# Altium PCB ESP32-C3FH4.PcbDoc (part 1 of 2)
Units mil, origin at the board's own origin, x right, y up, seen from the top; angles counter-clockwise.
Board outline 1414.34 x 2244.79 mil, 4 copper layers (Top Layer, GND, POWER, Bottom Layer), stack 30.634 mil thick; 67 components, 59 nets, 293 pads, 163 vias.
Unrouted connection lines stored in the file: 2.
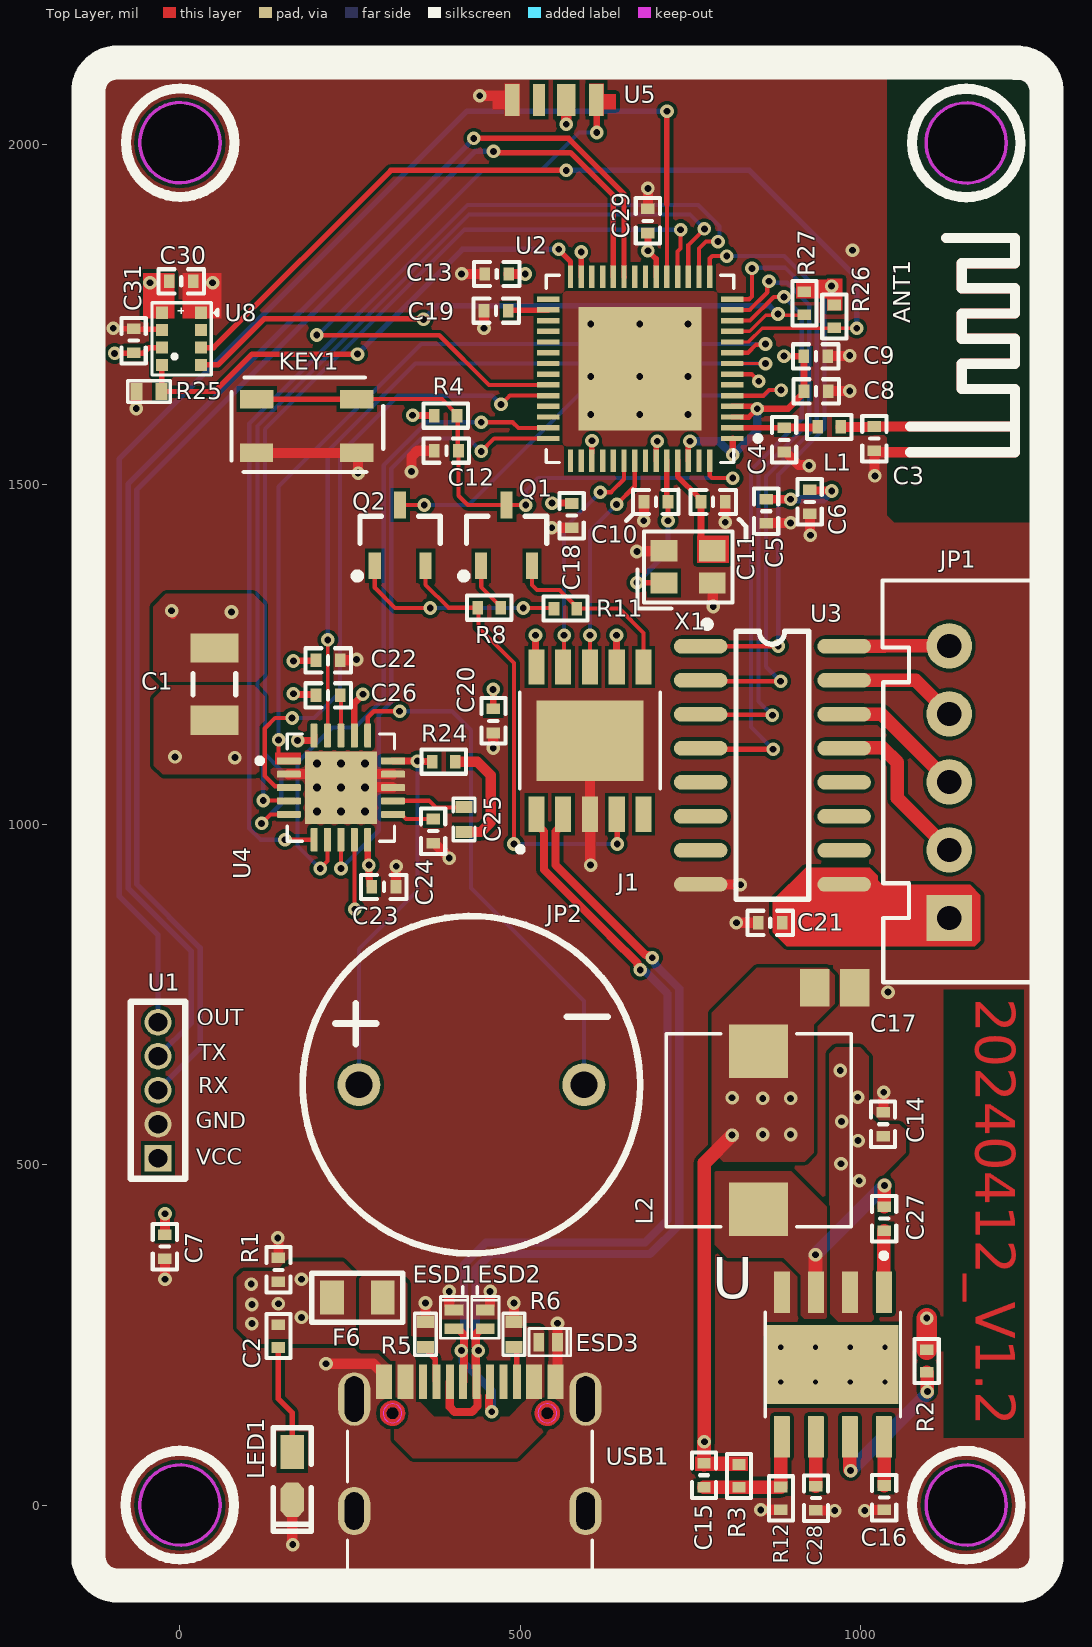
[diagram p0: Top Layer view]
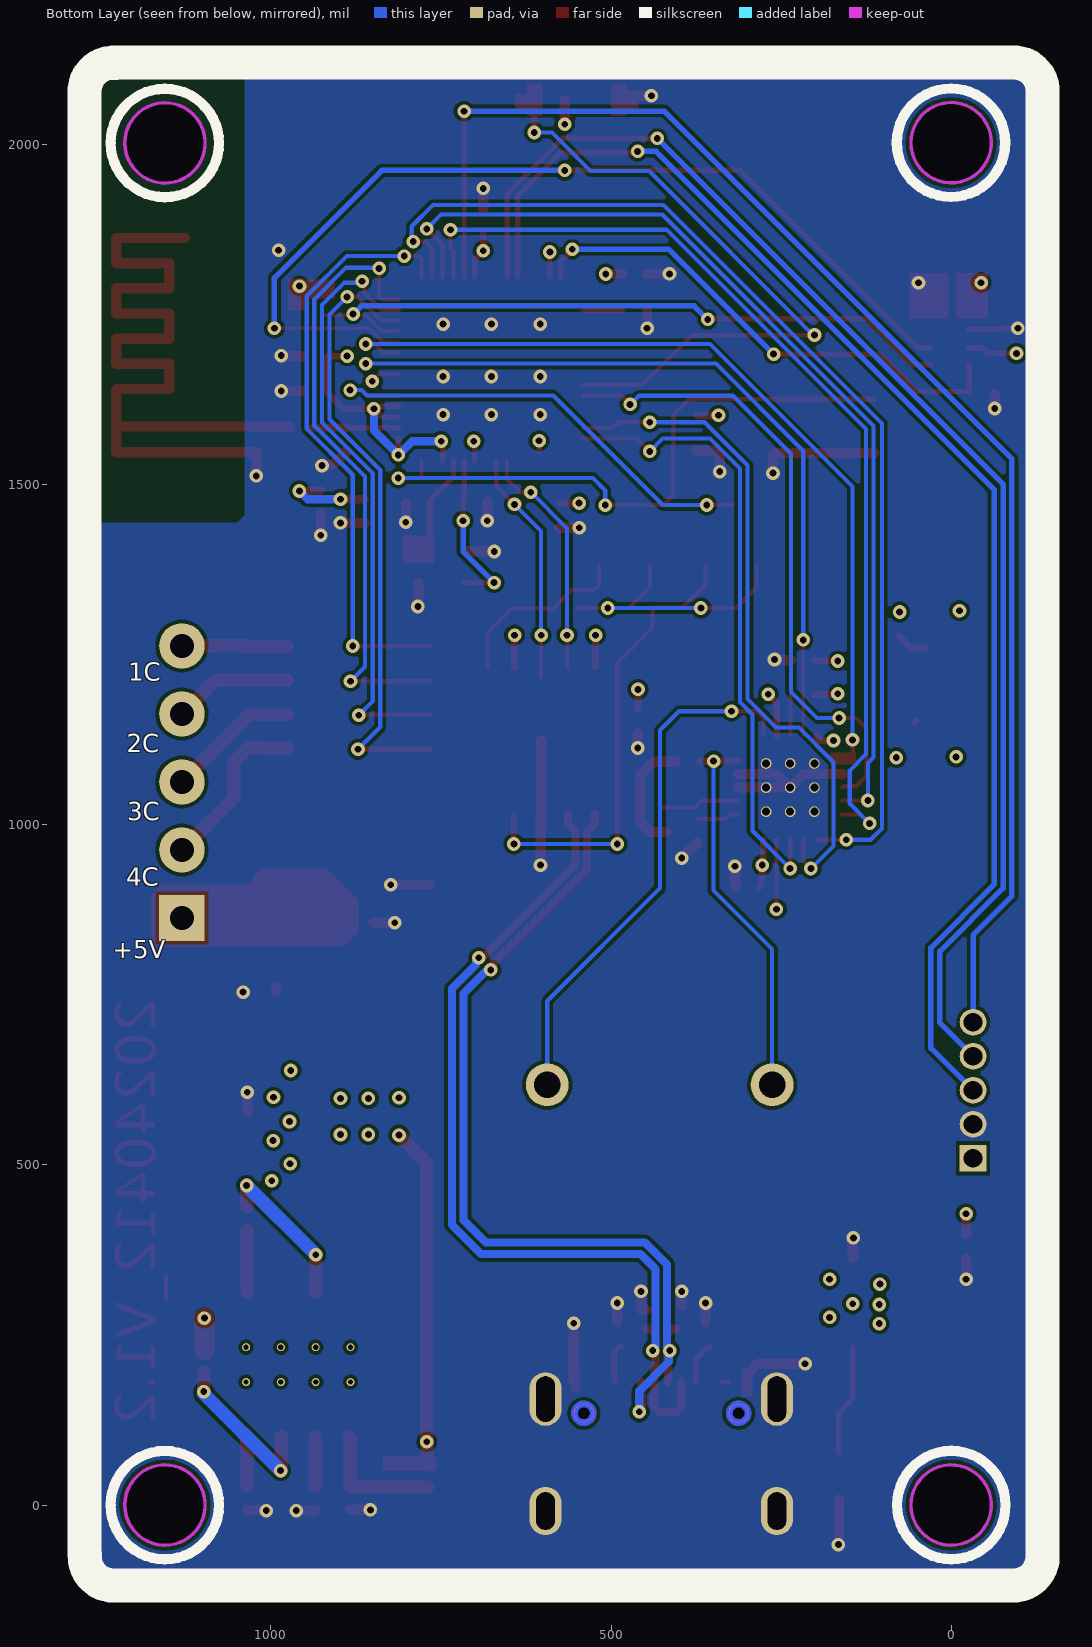
[diagram p1: Bottom Layer view, seen from below]
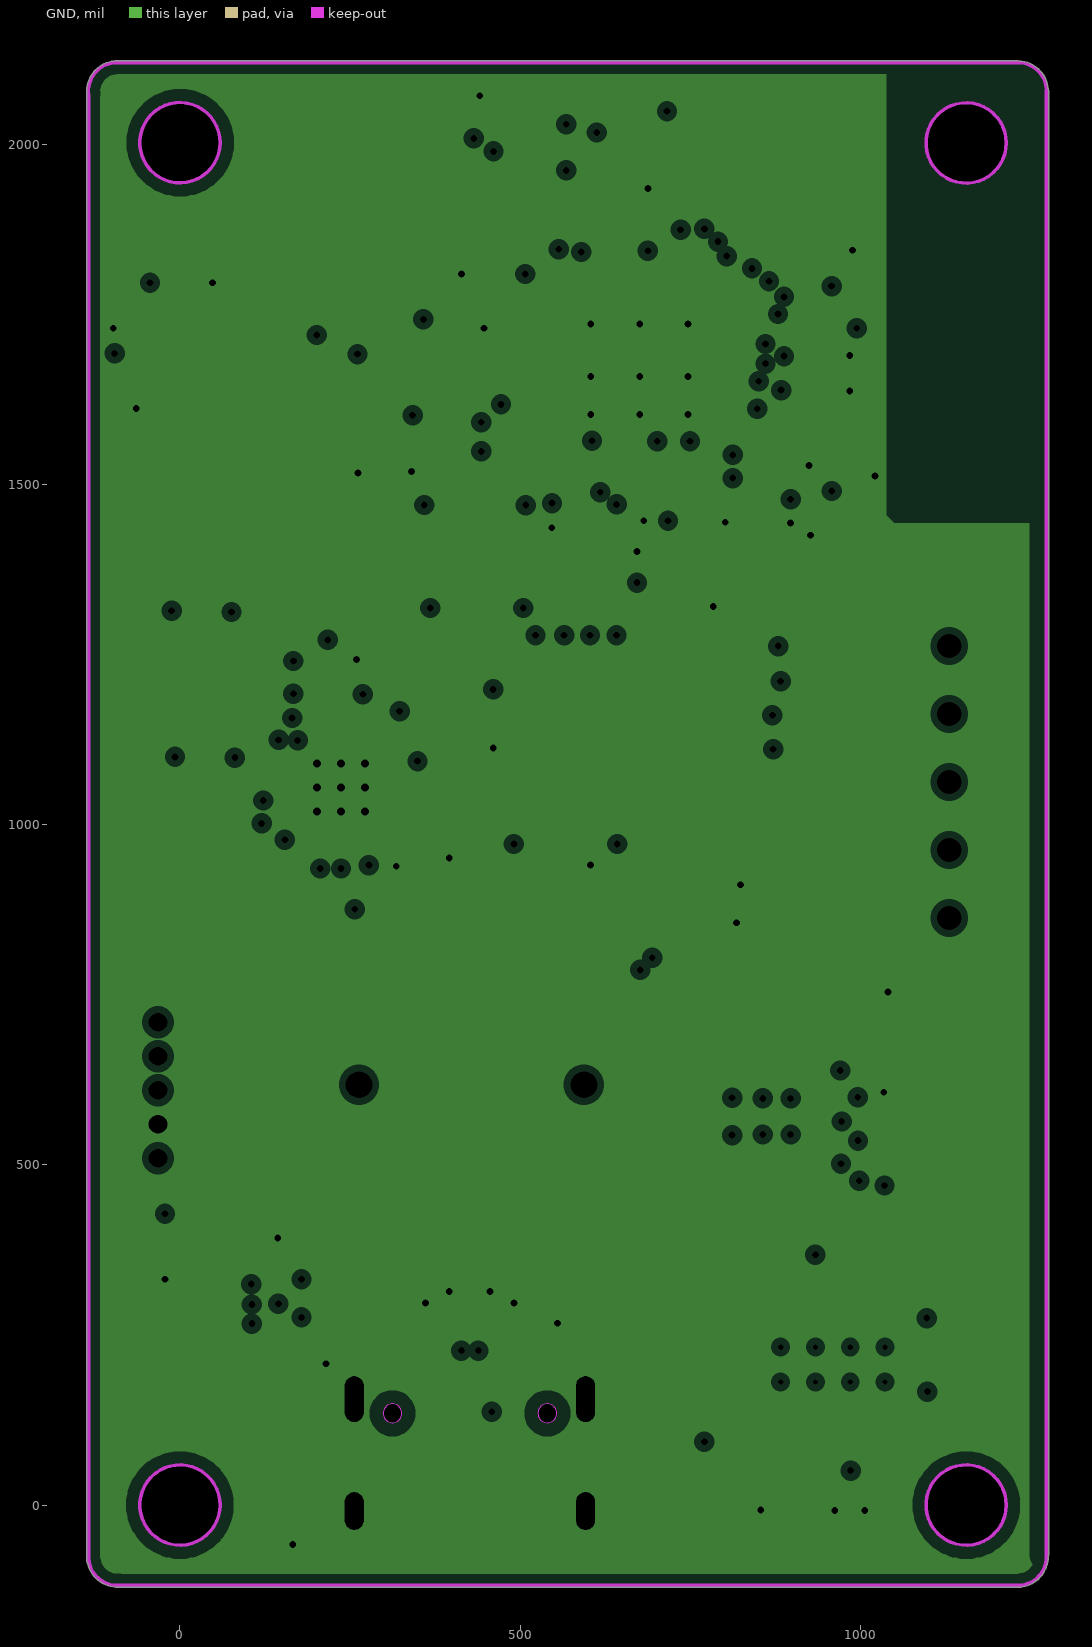
[diagram p2: GND, clearances drawn from the general rule]
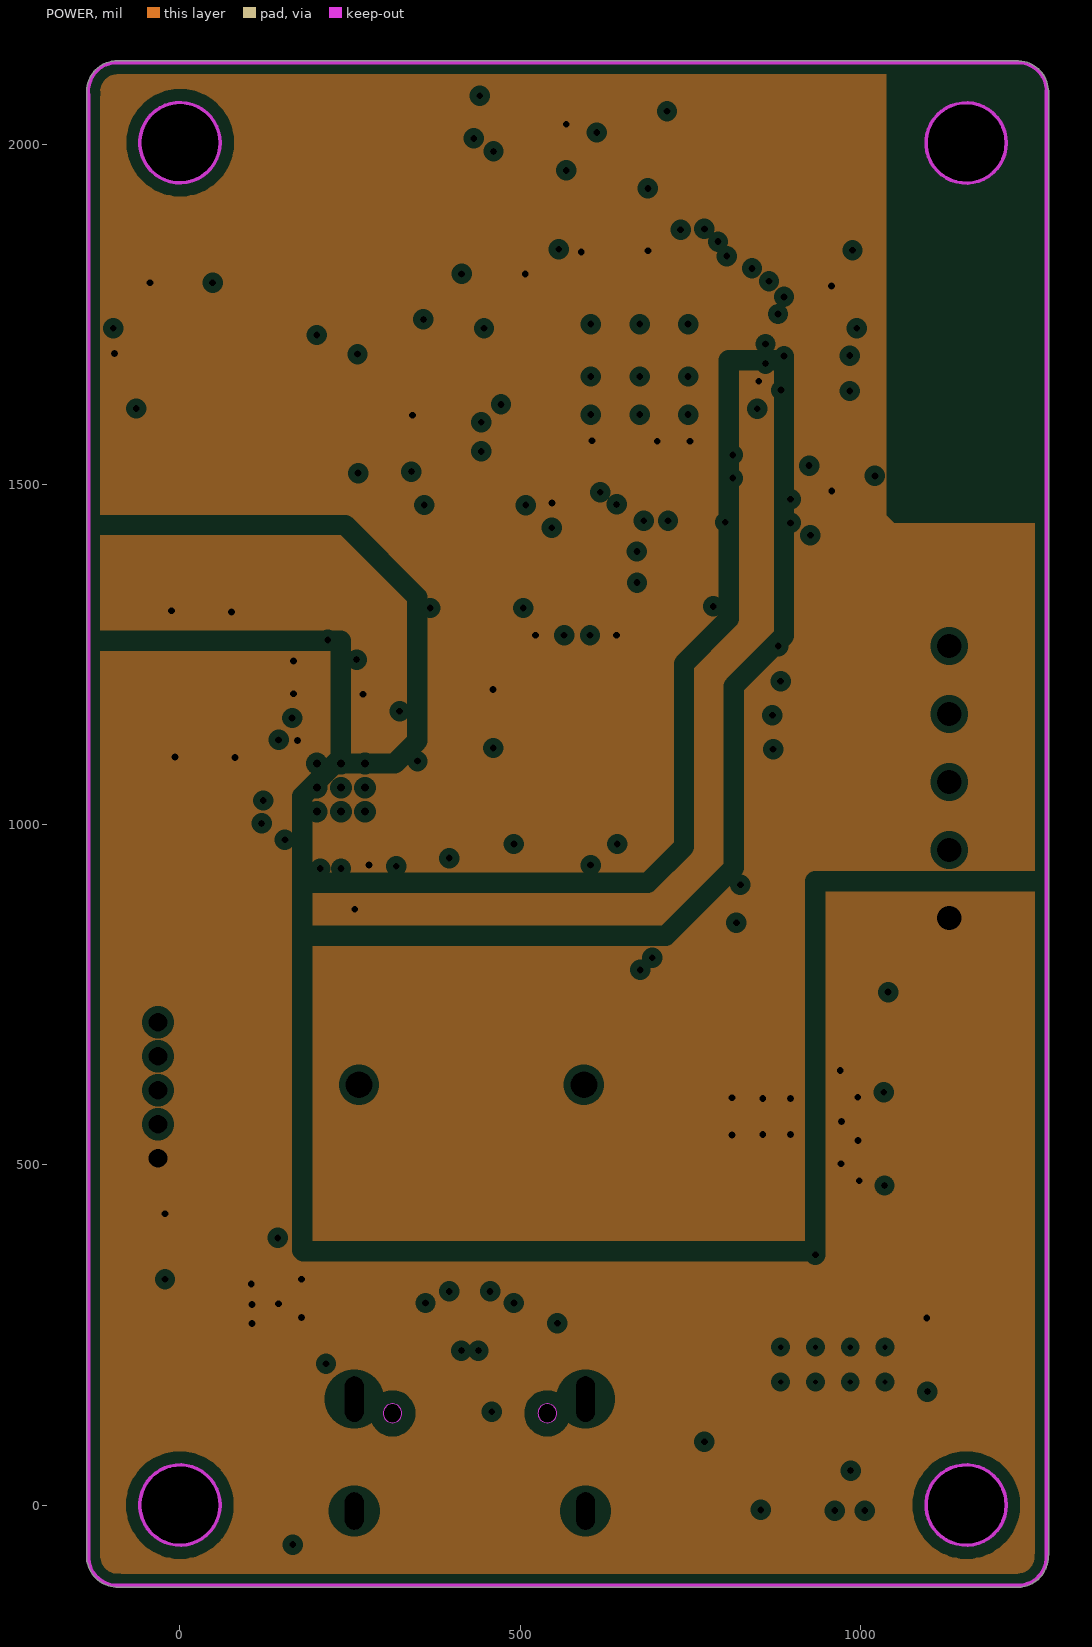
[diagram p3: POWER, clearances drawn from the general rule]
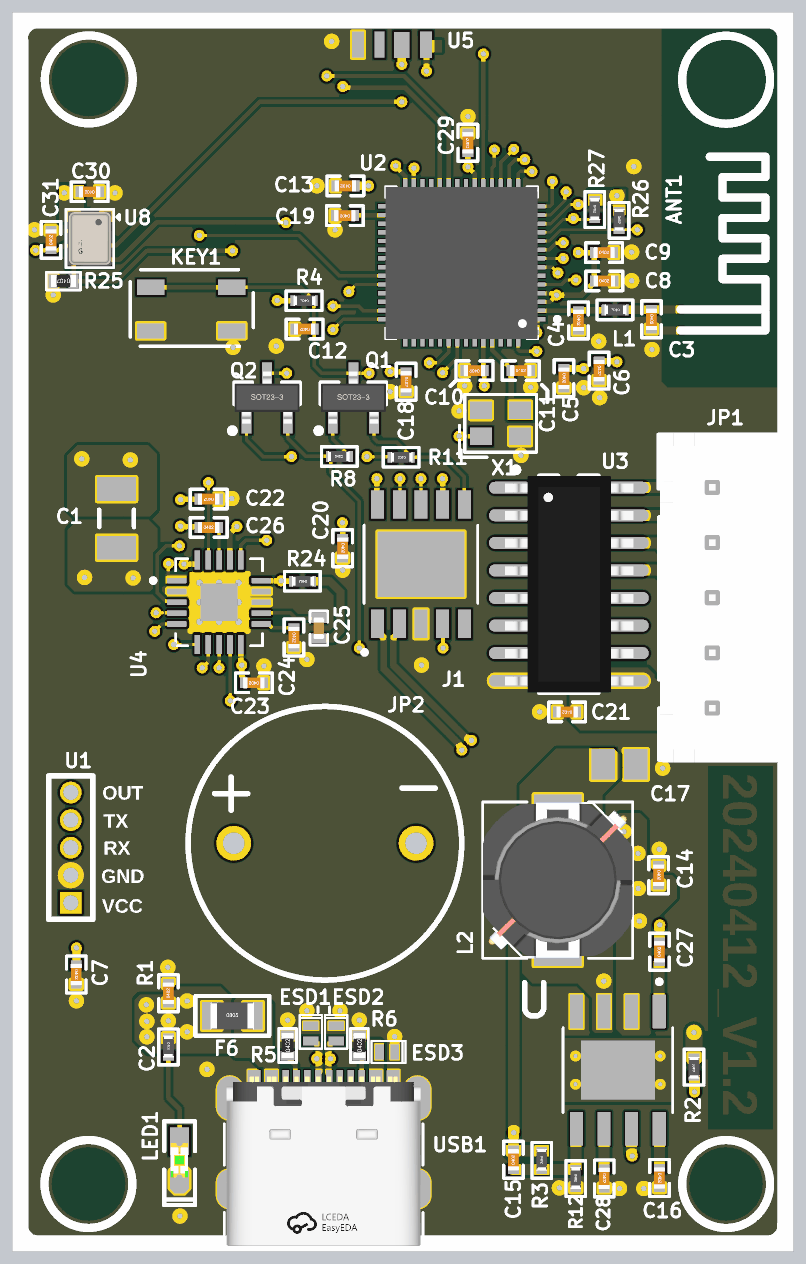
[diagram p4: 3D render of the assembled board from above, using the file's embedded part models]

## Layer stack, top to bottom
Top Solder: solder mask 0.4, Solder Resist, Dk 3.5
Top Layer: signal copper 1.4
Dielectric 1: core 10, FR-4, Dk 4.2
GND: plane copper 1.417, net GND
Dielectric 3: prepreg 5, Dk 4.2
POWER: plane copper 1.417, net (Multiple Nets)
Dielectric 2: core 10, Dk 4.2
Bottom Layer: signal copper 1.4
Bottom Solder: solder mask 0.4, Solder Resist, Dk 3.5

## Board outline
-137.31,-82.02 -137.31,2073.88 -137.03,2075.16 cw(c-92.21,2078.18) -97.24,2122.82 -95.21,2123.58 1231.89,2123.58 1233.89,2122.85 cw(c1231.64,2077.98) 1276.45,2081.16 1277.04,2079.28 1277.04,-72.82 1276.36,-75.82 cw(c1231.44,-75.82) 1238.5,-120.18 1236.19,-121.22 -88.91,-121.22 -90.59,-120.72 cw(c-91.91,-75.82)
cut-out: 1156.2,-59.09 cw(c1156.2,-0.03) 1097.14,-0.03 cw(c1156.2,-0.03) 1156.2,59.02 cw(c1156.2,-0.03) 1215.26,-0.03 cw(c1156.2,-0.03)
cut-out: 1156.2,1943.31 cw(c1156.2,2002.37) 1097.14,2002.37 cw(c1156.2,2002.37) 1156.2,2061.42 cw(c1156.2,2002.37) 1215.26,2002.37 cw(c1156.2,2002.37)
cut-out: 0.5,1943.82 cw(c0.5,2002.88) -58.56,2002.88 cw(c0.5,2002.88) 0.5,2061.93 cw(c0.5,2002.88) 59.56,2002.88 cw(c0.5,2002.88)
cut-out: -59.06,0 ccw(c0,0) 0,-59.06 ccw(c0,0) 59.06,0 ccw(c0,0) 0,59.06 ccw(c0,0)

## Design rules (kind name [scope] priority, off if disabled: settings)
Clearance [All] p1: gap=5 ignorepadtopadclearanceinfootprint=FALSE except(2: Arc-SMDPad Track-SMDPad SMDPad-SMDPad; 3: Arc-THPad Track-THPad SMDPad-THPad THPad-THPad)
ComponentClearance [All] p1: gap=10 collisioncheckmode=3 verticalgap=10 showdistances=TRUE
DiffPairsRouting DiffPairsRouting_2 [All] p1: maxlimit=5 minlimit=5 mostfreqgap=5 toplayer_minwidth=12 toplayer_maxwidth=12 toplayer_prefwidth=12 bottomlayer_minwidth=12 bottomlayer_maxwidth=12 bottomlayer_prefwidth=12 impedanceprofiledriven=TRUE impedanceprofileid={24D7325C-6BC3-4DBD-915D-B261285324E1} impedanceprofilevalue=90.000000 maxuncoupledlength=500
HoleToHoleClearance [All] p1: gap=0 allowstackedmicrovias=TRUE
MatchedLengths USB [InNetClass('USB')] p1: tolerance=20 checknetsindiffpair=TRUE checkdiffpairvsdiffpair=FALSE checkxsignals=FALSE checkothers=FALSE
MinimumSolderMaskSliver [All] p1: minsoldermaskwidth=0
PlaneClearance [All] p1: clearance=10
PlaneConnect [All] p1: planeconnectstyle=Direct reliefexpansion=20 reliefentries=4 reliefconductorwidth=10 reliefairgap=10
PolygonConnect [All] p1: connectstyle=Direct reliefconductorwidth=10 reliefentries=4 polygonreliefangle="90 Angle" airgapwidth=10
RoutingVias [All] p1: holewidth=10 width=20 viastyle="Through Hole" minholewidth=10 minwidth=20 maxholewidth=10 maxwidth=20
SilkToSilkClearance [All] p1: silktosilkclearance=0
SilkToSolderMaskClearance [IsPad] p1: minsilkscreentomaskgap=0 clearancetoexposedcopper=TRUE
SolderMaskExpansion [All] p1: expansion=4 istentingtop=FALSE
ViasUnderSMD [All] p1: allowed=FALSE
Width power [InNetClass('power')] p1: maxlimit=100 minlimit=12 preferedwidth=12
Width [All] p2: maxlimit=100 minlimit=5 preferedwidth=8 minimp=50.000000 maximp=50.000000 favimp=50.000000
22 further rules are at their usual default settings.

## Classes and differential pairs
differential pair class USB_Lines: D
net class USB: D_N D_P
differential pair D: +D_P -D_N

## Components (designator, comment, footprint, x,y, rotation, side; value= is the part's Value field where it differs from the comment)
ANT1 "2.4G" 2.4GÌìÏß 1073.48,1550.68 r270 top locked
C1 "CA45A-A-25V-2.2UF-K" INDC3216 50.79,1206.78 r270 top locked value=2.2uF
C2 "0.1uF/25V" "C 0402_L" 144.79,345.78 r90 top locked
C3 "0.4pF/25V" "C 0402_L" 1020.79,1567.78 r270 top locked
C4 "0.4pF/25V" "C 0402_L" 888.38,1565.78 r270 top locked
C5 "0.1uF/25V" "C 0402_L" 861.91,1460.95 r270 top locked
C6 "10uF/10V" "C 0402_L" 925.79,1474.78 r270 top locked
C7 "0.1uF/25V" "C 0402_L" -22.21,379.78 r270 top locked
C8 "10uF/10V" "C 0402_L" 935.27,1637.34 r0 top locked
C9 "0.1uF/25V" "C 0402_L" 934.79,1688.78 r0 top locked
C10 "20pF/25V" "C 0402_L" 699.79,1474.78 r180 top locked
C11 "20pF/25V" "C 0402_L" 783.79,1474.78 r0 top
C12 "1uF/10V" "C 0402_L" 391.72,1550.01 r180 top locked
C13 "0.1uF/25V" "C 0402_L" 465.79,1809.78 r180 top locked
C14 "22uF/10V" "C 0402_L" 1033.79,559.78 r270 top locked value=15P
C15 "10pF/10V" "C 0402_L" 770.39,43.78 r90 top locked value=15P
C16 "8.2nF/25V" "C 0402_L" 1035.29,10.86 r270 top locked
C17 "22uF/25V" C0805 962.79,760.67 r0 top locked
C18 "0.1uF/25V" "C 0402_L" 575.94,1454.53 r270 top locked
C19 "0.1uF/25V" "C 0402_L" 464.79,1755.78 r180 top locked
C20 "0.1uF/25V" "C 0402_L" 460.79,1152.78 r270 top locked
C21 "0.1uF/25V" "C 0402_L" 867.79,855.93 r180 top locked
C22 "0.1uF/25V" "C 0402_L" 217.79,1241.78 r180 top locked
C23 "10nF/25V" "C 0402_L" 299.79,908.78 r180 top locked
C24 "0.1uF/25V" "C 0402_L" 372.35,990.78 r270 top locked
C25 "330pF" Cap-0402 417.79,1007.78 r270 top locked
C26 "15nF/25V" "C 0402_L" 217.79,1190.34 r0 top locked
C27 "0.1uF/10V" "C 0402_L" 1035.29,420.98 r90 top locked value=15P
C28 "1uF/25V" "C 0402_L" 934.98,10.06 r270 top locked
C29 "0.1uF/25V" "C 0402_L" 687.79,1887.78 r90 top locked
C30 "0.1uF/25V" "C 0402_L" 2,1799 r180 top
C31 "0.1uF/25V" "C 0402_L" -68,1711.71 r90 top
ESD1 "ESD5311N-2/TR" X1-DFN1006-2_L1.0-W0.6-RD 403,273 r270 top locked
ESD2 "ESD5311N-2/TR" X1-DFN1006-2_L1.0-W0.6-RD 449,273 r270 top locked
ESD3 "ESD5311N-2/TR" X1-DFN1006-2_L1.0-W0.6-RD 541.21,239.38 r180 top
F6 "6V1A" "R 0805_L" 260.79,304.78 r0 top locked
J1 "CH340K" *SOP100P600X160-11N 602.79,1123.78 r90 top locked
JP1 "HDR-1X5" XH2.54-LI-5P 1130.97,1063 r90 top locked
JP2 "超声波探头_C242180" SENSOR-TH_GU12XXC-40XX 428.55,617.78 r0 top locked
KEY1 "6*6*5" "TSW SMD-6*6*5" 285.79,1635.78 r180 top locked
L1 "0R1%" "R 0402_L"#1 955.56,1584.98 r180 top locked
L2 "CLF7045T-3R3N-D" IND_CLF7045T-3R3N-D 850.79,550.86 r270 top locked value=0R1%
LED1 "GREEN" "LED 0603B" 164.79,42.78 r270 top locked
Q1 "S8050" SOT23-3L 480.25,1425.78 r0 top locked
Q2 "S8050" SOT23-3L 323.79,1425.78 r0 top locked
R1 "1K" "R 0402_L"#1 144.8,249.36 r270 top locked
R2 "10K" "R 0402_L"#1 1097.85,210.78 r90 top locked
R3 "84.5K" "R 0402_L"#1 821.84,43.78 r270 top locked
R4 "10K" "R 0402_L"#1 391.72,1601.45 r180 top locked
R5 "5.1K" Res-0402 361,251 r90 top locked
R6 "5.1K" Res-0402 491,251 r90 top locked
R8 "10K" "R 0402_L"#1 453.78,1319.22 r0 top locked
R11 "10K" "R 0402_L"#1 567.78,1317.78 r180 top locked
R12 "25.5K" "R 0402_L"#1 883.54,10.86 r270 top locked
R24 "200R" "R 0402_L"#1 388.79,1092.78 r180 top locked
R25 "100K" Res-0402 -45.5,1637 r180 top
R26 "10K" "R 0402_L"#2 962,1747.27 r270 top
R27 "10K" "R 0402_L"#2 918,1766.73 r270 top
U "TPS54339DDA" VREG_LM5017MR/NOPB 959.84,206.4 r270 top locked
U1 "HLK-LD2410B" HDR-TH_5P-P1.27-V-M -32.21,609.78 r90 top locked
U2 "ESP32-S2FN4R2" QFN40P700X700X90-57N 676.54,1670.36 r180 top locked
U3 "ULN2003" SOP16 870.42,1087.45 r0 top locked
U4 "TUSS4470TRTJT" QFN50P400X400X80-21N 236.7,1054.69 r0 top locked
U5 "SK6812 SIDE-A" "SK6812 SIDE-A" 717.11,2099.35 r180 top locked
U8 "SPL06-001" SPL06-001 2.46,1714.39 r0 top
USB1 "KH-TYPE-C-16P" KH-TYPE-C-16P 426.29,86.28 r0 top locked
X1 "40MHz" "OSC 2016-4P" 759.79,1389.78 r0 top locked

## Footprints (in the part's own frame and the unit in brackets; to place one, negate y for a bottom-side part, rotate by r counter-clockwise, add the part's x,y. Pads: shape width x height; smd on the part's side, far side on the other; paste and mask are expansions set on the pad)
2.4GÌìÏß [mil]
  rect 10x10 smd: 1(-35,0) 2(3,1)
  Top Layer lines w15: 3,0 3,1 3,154 -35,154 ; -35,0 -35,154 ; -312,53 -312,154 -275,154 -275,76 -238,76 -238,154 -201,154 -201,76 -164,76 -164,154 -127,154 -127,76 -90,76 -90,154 -35,154
  silkscreen extent -312,0 3,154
*SOP100P600X160-11N [mm]
  rect 1.31x0.6 smd: 1(-2.75,2) 2(-2.75,1) 3(-2.75,0) 4(-2.75,-1) 5(-2.75,-2) 6(2.75,-2) 7(2.75,-1) 8(2.75,0) 9(2.75,1) 10(2.75,2)
  rect 3x4 smd: 11(0,0)
  silkscreen extent -4.16,-2.62 1.8,2.7
C0805 [mm] "Chip Capacitor, Body 2.0x1.3mm, IPC High Density"
  rect 1.1x1.4 smd: 1(-0.75,0) 2(0.75,0)
  body extent -1.1,-0.72 1.1,0.72, height 1.4
"C 0402_L" [mm] "ÎÞ¼«ÐÔÌùÆ¬µçÈÝ"
  rect 0.4x0.5 smd: 1(-0.45,0) 2(0.45,0)
  silkscreen extent -0.85,-0.45 0.85,0.45, body extent -0.5,-0.26 0.5,0.26, height 0.53
Cap-0402 [mil]
  rect 18x25 smd mask+2.36: 1(-18.5,0) 2(18.5,0)
  silkscreen extent -31,-16 31,16, body extent -20,-10 20,10, height 19
HDR-TH_5P-P1.27-V-M [mm]
  rect 1x1 hole 0.7: 1(-2.54,0)
  round 1 hole 0.7: 2(-1.27,0) 3(0,0) 4(1.27,0) 5(2.54,0)
  silkscreen extent -3.3,-1.02 3.3,1.02
IND_CLF7045T-3R3N-D [mm]
  rect 2x2.2 smd: 1(-2.95,0) 2(2.95,0)
  silkscreen extent -3.6,-3.45 3.6,3.45, body extent -3.6,-3.45 3.6,3.45, height 4.8
INDC3216 [mm] "Chip Inductor, Body 3.2x1.6mm, IPC High Density"
  rect 1.1x1.8 smd: 1(-1.35,0) 2(1.35,0)
  silkscreen extent -0.4,-0.8 0.4,0.8, body extent -1.7,-0.9 1.7,0.9, height 0.55
KH-TYPE-C-16P [mm]
  oval 1.2x2 hole 0.7 slot 1.7 at 90 deg paste+0 mask+0.051: 1(-4.32,1.765) 2(4.32,1.765)
  oval 1.2x1.8 hole 0.7 slot 1.4 at 90 deg paste+0 mask+0.051: 3(-4.32,-2.415) 4(4.32,-2.415)
  rect 0.3x1.3 smd paste-100 mask+0.05: A1(-3.35,2.415) A4(-2.55,2.415) A5(-1.25,2.415) A6(-0.25,2.415) A7(0.25,2.415) A8(1.25,2.415) A9(2.55,2.415) A12(3.35,2.415) B1(3.05,2.415) B4(2.25,2.415) B5(1.75,2.415) B6(0.75,2.415) B7(-0.75,2.415) B8(-1.75,2.415) B9(-2.25,2.415) B12(-3.05,2.415)
  Keep-Out Layer board cut-out: 3.24,1.235 3.205,1.387 3.108,1.509 2.968,1.576 2.812,1.576 2.672,1.509 2.574,1.387 2.54,1.235 2.54,1.235 2.575,1.083 2.672,0.961 2.812,0.894 2.968,0.894 3.108,0.961 3.205,1.083 3.24,1.235
  Keep-Out Layer board cut-out: -2.54,1.235 -2.575,1.387 -2.672,1.509 -2.812,1.576 -2.968,1.576 -3.108,1.509 -3.206,1.387 -3.24,1.235 -3.24,1.235 -3.205,1.083 -3.108,0.961 -2.968,0.894 -2.812,0.894 -2.672,0.961 -2.575,1.083 -2.54,1.235
  Multi-Layer circle w0.254: c-2.89,1.235 r0.35
  Multi-Layer circle w0.254: c2.89,1.235 r0.35
  silkscreen extent -4.57,-5.08 4.57,0.57, body extent -4.47,-5.05 4.47,2.76, height 3.25
"LED 0603B" [mil] "À¶É«0603LED"
  rect 50x35 smd: 1(-35,0.26)
  oct 50x35 smd: 2(35,0.26)
  silkscreen extent -71,-28 81,28, body extent -31,-16 32,16, height 24
"OSC 2016-4P" [mm]
  rect 1x0.8 smd: 1(-1.222,-0.872) 2(0.577,-0.871) 3(0.577,0.328) 4(-1.223,0.328)
  silkscreen extent -2.21,-1.83 1.33,1.06
QFN40P700X700X90-57N [mm]
  rect 0.84x0.2 smd mask+0.05: 1(-3.435,2.6) 2(-3.435,2.2) 3(-3.435,1.8) 4(-3.435,1.4) 5(-3.435,1) 6(-3.435,0.6) 7(-3.435,0.2) 8(-3.435,-0.2) 9(-3.435,-0.6) 10(-3.435,-1) 11(-3.435,-1.4) 12(-3.435,-1.8) 13(-3.435,-2.2) 14(-3.435,-2.6) 29(3.435,-2.6) 30(3.435,-2.2) 31(3.435,-1.8) 32(3.435,-1.4) 33(3.435,-1) 34(3.435,-0.6) 35(3.435,-0.2) 36(3.435,0.2) 37(3.435,0.6) 38(3.435,1) 39(3.435,1.4) 40(3.435,1.8) 41(3.435,2.2) 42(3.435,2.6)
  rect 0.2x0.84 smd mask+0.05: 15(-2.6,-3.435) 16(-2.2,-3.435) 17(-1.8,-3.435) 18(-1.4,-3.435) 19(-1,-3.435) 20(-0.6,-3.435) 21(-0.2,-3.435) 22(0.2,-3.435) 23(0.6,-3.435) 24(1,-3.435) 25(1.4,-3.435) 26(1.8,-3.435) 27(2.2,-3.435) 28(2.6,-3.435) 43(2.6,3.435) 44(2.2,3.435) 45(1.8,3.435) 46(1.4,3.435) 47(1,3.435) 48(0.6,3.435) 49(0.2,3.435) 50(-0.2,3.435) 51(-0.6,3.435) 52(-1,3.435) 53(-1.4,3.435) 54(-1.8,3.435) 55(-2.2,3.435) 56(-2.6,3.435)
  rect 4.6x4.6 smd paste-3: 57(0,0)
  silkscreen extent -4.5,-3.5 3.5,3.5, body extent -3.5,-3.5 3.5,3.5, height 0.9
QFN50P400X400X80-21N [mm]
  rrect25% 0.89x0.26 smd: 1(-1.945,1) 2(-1.945,0.5) 3(-1.945,0) 4(-1.945,-0.5) 5(-1.945,-1) 11(1.945,-1) 12(1.945,-0.5) 13(1.945,0) 14(1.945,0.5) 15(1.945,1)
  rrect25% 0.26x0.89 smd: 6(-1,-1.945) 7(-0.5,-1.945) 8(0,-1.945) 9(0.5,-1.945) 10(1,-1.945) 16(1,1.945) 17(0.5,1.945) 18(0,1.945) 19(-0.5,1.945) 20(-1,1.945)
  rect 2.7x2.7 smd paste-2: 21(0,0)
  round 0.4 hole 0.3 mask+0: 22(-0.9,0.9) 23(0,0.9) 24(0.9,0.9) 25(-0.9,0) 26(0,0) 27(0.9,0) 28(-0.9,-0.9) 29(0,-0.9) 30(0.9,-0.9)
  silkscreen extent -3.13,-2 2,2
"R 0402_L"#1 [mm] "1/16WÌùÆ¬µç×è"
  rect 0.4x0.5 smd: 1(-0.4,0) 2(0.45,0)
  silkscreen extent -0.8,-0.45 0.85,0.45, body extent -0.5,-0.25 0.5,0.25, height 0.3
"R 0402_L"#2 [mm]
  rect 0.4x0.5 smd: 1(-0.425,0) 2(0.425,0)
  silkscreen extent -0.82,-0.45 0.83,0.45, body extent -0.52,-0.25 0.48,0.25, height 0.3
"R 0805_L" [mil] "1/8WÌùÆ¬µç×è"
  rect 35x50 smd: 1(-37.4,0) 2(37.4,0)
  silkscreen extent -67,-36 67,36, body extent -39,-25 39,25, height 20
Res-0402 [mil]
  rect 18x25 smd mask+2.17: 1(-18.5,0) 2(18.5,0)
  silkscreen extent -32,-17 32,16, body extent -23,-11 23,11, height 16
SENSOR-TH_GU12XXC-40XX [mm]
  round 1.6 hole 1: 1(-4.2,0) 2(4.2,0)
  silkscreen extent -6.3,-6.3 6.3,6.3
"SK6812 SIDE-A" [mm]
  rect 0.55x1.2 smd: 1(2.667,0.855) 4(5.806,0.853)
  rect 0.7x1.2 smd: 2(3.789,0.858)
  rect 0.45x1.2 smd: 3(4.809,0.853)
  Top Layer region: 2.938,0.255 2.387,0.255 2.387,0.64 1.935,0.64 1.935,1.201 2.388,1.201 2.388,1.453 2.936,1.453
  Top Layer region: 5.53,1.452 6.081,1.452 6.081,1.204 6.533,1.204 6.533,0.647 6.08,0.647 6.08,0.254 5.532,0.254
SOP16 [mm] "£¨ËâÃ×¹¤·»£©"
  oval 2x0.55 smd: 1(-2.667,4.445) 2(-2.667,3.175) 3(-2.667,1.905) 4(-2.667,0.635) 5(-2.667,-0.635) 6(-2.667,-1.905) 7(-2.667,-3.175) 8(-2.667,-4.445) 9(2.692,-4.445) 10(2.692,-3.175) 11(2.692,-1.905) 12(2.692,-0.635) 13(2.692,0.635) 14(2.692,1.905) 15(2.692,3.175) 16(2.692,4.445)
  silkscreen extent -2.55,-5 1.37,5.39, body extent -2.92,-4.99 2.98,4.99, height 1.45
SOT23-3L [mm] "3x1.3x1mm(³¤¿í¸ß)"
  rect 0.45x1 smd: 1(-0.95,-1.143) 2(0.95,-1.143) 3(0,1.125)
  silkscreen extent -1.72,-1.65 1.5,0.7, body extent -1.5,-1.2 1.5,1.2, height 1.05
SPL06-001 [mm]
  rect 0.45x0.45 smd: 1(0.725,0.975) 2(0.725,0.325) 3(0.725,-0.325) 4(0.725,-0.975) 5(-0.725,-0.975) 6(-0.725,-0.325) 7(-0.725,0.325) 8(-0.725,0.975)
  silkscreen extent -1.1,-1.35 1.36,1.35, body extent -1,-1.25 1,1.25, height 0.96
"TSW SMD-6*6*5" [mm] "6*6*5mm"
  rect 1.25x0.7 smd: 1(0.66,2.261) 2(0.66,0.254) 3(4.394,0.254) 4(4.4,2.261)
  silkscreen extent -0.33,-0.56 5.33,2.97
VREG_LM5017MR/NOPB [mm]
  rrect5% 1.55x0.6 smd mask+0: 1(-2.7,1.905) 2(-2.7,0.635) 3(-2.7,-0.635) 4(-2.7,-1.905) 5(2.7,-1.905) 6(2.7,-0.635) 7(2.7,0.635) 8(2.7,1.905)
  rect 2.95x4.9 smd paste-3 mask+0: 9(0,0)
  round 0.3 hole 0.2: 10(-0.65,1.95) 11(0.65,1.95) 12(-0.65,0.65) 13(0.65,0.65) 14(-0.65,-0.65) 15(0.65,-0.65) 16(-0.65,-1.95) 17(0.65,-1.95)
  silkscreen extent -4.17,-2.52 1.95,2.52
X1-DFN1006-2_L1.0-W0.6-RD [mm]
  rect 0.4x0.7 smd paste+0 mask+0.051: 1(-0.35,0) 2(0.35,0)
  silkscreen extent -0.85,-0.51 0.71,0.51
XH2.54-LI-5P [mm] "½Ó²å¼þ£¬5P"
  rect 1.7x1.7 hole 0.9: 1(-5.08,0)
  round 1.7 hole 0.9: 2(-2.54,0) 3(0,0) 4(2.54,0) 5(5.08,0)
  silkscreen extent -7.48,-3.45 7.52,2.49, body extent -7.58,-3.3 7.58,2.4, height 7.03

## Part data
ANT1: library part ANT1, "PCB板载天线", BOM名称=PCB板载天线, 学习资源=www.ooocke.com, 版权归属=源创客
C1: library part "Cap Pol2", "Polarized Capacitor (Axial)", LatestRevisionDate=17-Jul-2002, LatestRevisionNote="Re-released for DXP Platform.", PackageDescription="Polarized Capacitor; 2 Leads", PackageReference=POLAR0.8, Published=8-Jun-2000, Publisher="Altium Limited"
C2 C3 C4 C5 C6 C7 C8 C9 C10 C11 C12 C13 C16 C17 C18 C19 C20 C21 C22 C23 C24 C26 C28 C29: library part C
C14 C15 C27: library part Cap, "Capacitor", Manufacturer="Generic Components", Class=Passive, Published=08/06/2000, Publisher="Altium Hobart Technology Centre", SubClass=Capacitor
C25: library part CC0402KRX7R9BB331, "50V 330pF X7R ±10% 0402 Multilayer Ceramic Capacitors MLCC - SMD/SMT ROHS", LCSC Part Number=C106206, Manufacturer=YAGEO, ComponentLink1Description=LCSC, ComponentLink1URL=https://www.lcsc.com/product-detail/Multilayer-Ceramic-Capacitors-MLCC-SMD-SMT_YAGEO-CC0402KRX7R9BB331_C106206.html, Item Type=Capacitor, Manufacturer Part Number=CC0402KRX7R9BB331
C30 C31: library part Capacitor
ESD1 ESD2 ESD3: library part tvs管
F6: library part JK-SMD0603-100L, JLCPCB Part Class="Extended Part", Manufacturer="Jinrui Electronic Materials Co.", Add into BOM=yes, Convert to PCB=yes, Device=JK-SMD0603-100L, Manufacturer Part=JK-SMD0603-100L, Name=6V1.5A, Origin Footprint=F0603, Supplier=LCSC, Supplier Part=C516069, Symbol=6V1A
J1: "USB to Serial Port Chip", Package=Package, Check_prices=https://www.snapeda.com/parts/CH340K/WCH/view-part/?ref=eda, MF=WCH, MP=CH340K, SnapEDA_Link=https://www.snapeda.com/parts/CH340K/WCH/view-part/?ref=snap
JP1: library part "Header 5", "5P接插件", BOM名称=5P接插件, 学习资源=www.ooocke.com, 版权归属=源创客
JP2: library part "Header 2", "2P接插件", BOM名称=2P接插件, 学习资源=www.ooocke.com, 版权归属=源创客
KEY1: library part "TSW DIP-6x6", "直插6x6轻触开关", BOM名称=直插6x6轻触开关, 学习资源=www.ooocke.com, 版权归属=源创客
L1 L2: library part L, Code_IEC=1005, Code_JEITA=0402, LatestRevisionDate=29-May-2009, LatestRevisionNote="IPC-7351 Footprint Added.", PackageDescription="Chip Inductor", PackageReference=0402-A, Published=8-Jun-2000, Publisher="Altium Limited"
LED1: library part LED-SH-5MM, "5mm草帽LED", BOM名称=5mm草帽LED, 学习资源=www.ooocke.com, 版权归属=源创客
Q1 Q2: Manufacturer=WPMtek(维攀微), Add into BOM=yes, Convert to PCB=yes, Device=S8050, Manufacturer Part=S8050, Name=S8050, Origin Footprint=SOT-23-3_L2.9-W1.3-P1.90-LS2.4-BR, Supplier=LCSC, Supplier Part=C2688231, Symbol=S8050
R1 R2 R3 R4 R8 R11 R12 R24: library part Res
R5 R6: library part RC0402FR-075K1L, "RES 5.1K OHM 1% 1/16W 0402", Case Code (Imperial)=0402, Case Code (Metric)=1005, LCSC Part Number=C105872, Manufacturer=Yageo, Max Operating Temperature=155°C, Max Power Dissipation=63mW, Min Operating Temperature=-55°C, Package Quantity=1, Resistance=5.1kR, Resistance Tolerance=1%, Resistor Type="Thick Film", Temperature Coefficient=100ppm/°C, Voltage Rating=50V, Case/Package=0402, Category="Chip SMD Resistors", ComponentLink1Description=https://datasheet.ciiva.com/7983/1018594-7983519.pdf?src-supplier=Element14, ComponentLink1URL=https://datasheet.ciiva.com/7983/1018594-7983519.pdf?src-supplier=Element14, ComponentLink2Description=https://datasheet.ciiva.com/46394/1018594-46394936.pdf?src-supplier=Element14, ComponentLink2URL=https://datasheet.ciiva.com/46394/1018594-46394936.pdf?src-supplier=Element14, ComponentLink3Description=https://datasheet.ciiva.com/2453/pyu-r-int-thick-7-2453401.pdf?src-supplier=Digi-Key, ComponentLink3URL=https://datasheet.ciiva.com/2453/pyu-r-int-thick-7-2453401.pdf?src-supplier=Digi-Key, ComponentLink4Description=https://datasheet.ciiva.com/2453/pyu-r-int-thick-7-2453402.pdf?src-supplier=Digi-Key, ComponentLink4URL=https://datasheet.ciiva.com/2453/pyu-r-int-thick-7-2453402.pdf?src-supplier=Digi-Key, ComponentLink5Description=https://datasheet.ciiva.com/2453/pyu-r-int-thick-7-2453400.pdf?src-supplier=Digi-Key, ComponentLink5URL=https://datasheet.ciiva.com/2453/pyu-r-int-thick-7-2453400.pdf?src-supplier=Digi-Key, ComponentLink6Description=https://datasheet.ciiva.com/12558/pyu-rc0402-51-rohs-l-6-r-8721-12558460.pdf?src-supplier=Mouser, ComponentLink6URL=https://datasheet.ciiva.com/12558/pyu-rc0402-51-rohs-l-6-r-8721-12558460.pdf?src-supplier=Mouser, ComponentLink7Description=https://datasheet.ciiva.com/16744/pyu-rc0402-51-rohs-l-6-r-16744283.pdf?src-supplier=Future+Electronics, ComponentLink7URL=https://datasheet.ciiva.com/16744/pyu-rc0402-51-rohs-l-6-r-16744283.pdf?src-supplier=Future+Electronics, ComponentLink8Description=https://datasheet.ciiva.com/15189/getdatasheetpartid-323636-15189493.pdf?src-supplier=Verical, ComponentLink8URL=https://datasheet.ciiva.com/15189/getdatasheetpartid-323636-15189493.pdf?src-supplier=Verical, Construction=Rectangular, Depth=0.5mm, Features="Moisture Resistant", Height=0.016inch, Item Type=Resistor, Lead Free="Lead Free", Length=1mm, Manufacturer Part Number=RC0402FR-075K1L, Military Standard=Not, Number of Terminations=2, Packaging="Tape and Reel", Power Rating=63mW, Pricing 1="10000=0.00085 (USD)", RoHS=Yes, RoHS Compliant=Yes, Series=RC, Stock 1=65000, Supplier 1=Avnet, Supplier Part Number 1=RC0402FR-075K1L, Technology="THICK FILM", Termination=SMD/SMT, Tolerance=1%, Voltage Rating (DC)=50V, Width=0.02inch, Working Voltage=50V
R25: library part RC0402FR-07100KL, "RES 100K OHM 1% 1/16W 0402", Case Code (Imperial)=0402, Case Code (Metric)=1005, LCSC Part Number=C60491, Manufacturer=Yageo, Max Operating Temperature=155°C, Max Power Dissipation=63mW, Min Operating Temperature=-55°C, Package Quantity=1, Resistance=100kR, Resistance Tolerance=1%, Resistor Type="Thick Film", Supplier Part Number 1=603-RC0402FR-07100KL, Temperature Coefficient=100ppm/°C, Voltage Rating=50V, Case/Package=0402, Category="Chip SMD Resistors", ComponentLink1Description=https://datasheet.ciiva.com/11819/0900766b80c66297-11819452.pdf?src-supplier=RSComponents, ComponentLink1URL=https://datasheet.ciiva.com/11819/0900766b80c66297-11819452.pdf?src-supplier=RSComponents, ComponentLink2Description=https://datasheet.ciiva.com/22747/1018594-22747509.pdf?src-supplier=Element14, ComponentLink2URL=https://datasheet.ciiva.com/22747/1018594-22747509.pdf?src-supplier=Element14, ComponentLink3Description=https://datasheet.ciiva.com/2453/pyu-r-int-thick-7-2453362.pdf?src-supplier=Digi-Key, ComponentLink3URL=https://datasheet.ciiva.com/2453/pyu-r-int-thick-7-2453362.pdf?src-supplier=Digi-Key, ComponentLink4Description=https://datasheet.ciiva.com/2453/pyu-r-int-thick-7-2453363.pdf?src-supplier=Digi-Key, ComponentLink4URL=https://datasheet.ciiva.com/2453/pyu-r-int-thick-7-2453363.pdf?src-supplier=Digi-Key, ComponentLink5Description=https://datasheet.ciiva.com/2453/pyu-r-int-thick-7-2453361.pdf?src-supplier=Digi-Key, ComponentLink5URL=https://datasheet.ciiva.com/2453/pyu-r-int-thick-7-2453361.pdf?src-supplier=Digi-Key, ComponentLink6Description=https://datasheet.ciiva.com/12667/pyu-rc0402-51-rohs-l-6-r-12667930.pdf?src-supplier=Mouser, ComponentLink6URL=https://datasheet.ciiva.com/12667/pyu-rc0402-51-rohs-l-6-r-12667930.pdf?src-supplier=Mouser, ComponentLink7Description=https://datasheet.ciiva.com/15189/getdatasheetpartid-323696-15189334.pdf?src-supplier=Verical, ComponentLink7URL=https://datasheet.ciiva.com/15189/getdatasheetpartid-323696-15189334.pdf?src-supplier=Verical, Construction=Rectangular, Depth=0.5mm, Features="Moisture Resistant", Height=0.016inch, Item Type=Resistor, Lead Free="Lead Free", Length=0.039inch, Manufacturer Part Number=RC0402FR-07100KL, Military Standard=Not, Number of Terminations=2, Packaging="Tape and Reel", Power Rating=63mW, Pricing 1="1=0.10000, 10=0.01200, 50=0.01200, 100=0.00500, 1000=0.00300, 2500=0.00200, 10000=0.00100 (USD)", REACH SVHC="No SVHC", RoHS=Yes, RoHS Compliant=Yes, Series=RC, Stock 1=7759549, Supplier 1=Mouser, Technology="THICK FILM", Termination=SMD/SMT, Tolerance=1%, Width=0.02inch, Working Voltage=50V
R26 R27: library part Resistor
U: library part TPS54339EDDA, "4.5V to 23V Input, 3A Synchronous Step-Down Converter with D-CAP2 Mode and Light Load Efficiency 8-SO PowerPAD -40 to 85", Package="HSOIC-8 Texas Instruments", Availability=Unavailable, MF="Texas Instruments", MP=TPS54339EDDA, Price=None, SnapEDA_Link=https://www.snapeda.com/parts/TPS54339EDDA/Texas%20Instruments/view-part/1156774/?ref=snap
U2: "RF System on a Chip - SoC SMD Wi-Fi IC ESP32-S2FN4R2, single-core MCU, 4 MB flash and 2 MB PSRAM inside, QFN 56-pin, 7*7 mm", Package="QFN-56 Espressif Systems", Check_prices=https://www.snapeda.com/parts/ESP32-S2FN4R2/Espressif+Systems/view-part/?ref=eda, MF="Espressif Systems", MP=ESP32-S2FN4R2, SnapEDA_Link=https://www.snapeda.com/parts/ESP32-S2FN4R2/Espressif+Systems/view-part/?ref=snap
U3: library part ULN2003-2, "达林顿驱动芯片", BOM名称=达林顿驱动芯片, 学习资源=www.ooocke.com, 版权归属=源创客
U4: "ULTRASONIC SENSOR I/F FOR PARK A", Package=None, Availability=Unavailable, MP=TUSS4470TRTJT, Price=None
U5: "INTEGRATED LIGHT SOURCE INTELLIGENT CONTROL OF / CHIP-ON-TOP SMD TYPE LED"
U8: "LGA-8(2x2.5) Pressure Sensors ROHS", LCSC Part Number=C2684428, Manufacturer=Goertek, Package=LGA-8(2x2.5), Item Type=Sensor, Manufacturer Part Number=SPL06-001
USB1: "3A 1 Surface Mount，Right Angle 16P Female -40℃~+85℃ Type-C SMD USB Connectors ROHS", LCSC Part Number=C709357, Manufacturer="Shenzhen Kinghelm Elec", Package=SMD, ComponentLink1Description=LCSC, ComponentLink1URL=https://www.lcsc.com/product-detail/USB-Connectors_Shenzhen-Kinghelm-Elec-KH-TYPE-C-16P_C709357.html, Item Type="Type-C SMD USB", Manufacturer Part Number=KH-TYPE-C-16P
X1: library part XTAL-MC-4P, "MC系列4脚晶振", BOM名称=2脚无源脚晶振, 学习资源=www.ooocke.com, 版权归属=源创客

## Via types
v1: diameter 20, hole 10, Top Layer to Bottom Layer, 163 vias

## Nets (pads, with @x,y where several pads share a name; then routed paths per layer and width w, separated by ;. In a path a pad name is that pad's centre, name@x,y a point inside that pad or via, vN(x,y) a via of type N, cw(c..) or ccw(c..) an arc to the next point about the centre after c; other vN are vias at no path point)
1IN: U2.15 U3.1 | length 877.5
  Top Layer w6.16: U3.1 v1@879.39,1262.45 ; U2.15 778.91,1832.39 782.51,1836 v1(804,1836)
  Bottom Layer w6.16: v1(804,1836) 888.43,1836 947.48,1776.95 947.48,1582.34 879.73,1514.59 v1(879.73,1262.78)
2IN: U2.14 U3.2 | length 906.4
  Top Layer w6.16: U3.2 766.87,1211 v1(883,1211) ; U2.14 836.92,1772.72 841,1776.8 v1(841,1817.92)
  Bottom Layer w6.16: v1(841,1817.92) 842.08,1819 889.65,1819 936.32,1772.33 936.32,1586.96 861.65,1512.29 861.65,1232.35 v1(883,1211)
3.3V: C5.1 C6.1 C8.1 C9.1 C13.1 C15.2 C17.1 C18.1 C20.1 C23.2 C29.1 C30.2 C31.1 J1.7 J1.10 L2.1 R3.1 R4.2 R26.1 R27.1 U2.1 U2.3 U2.4 U2.20 U2.27 U2.45 U2.51 U2.54 U4.10 U5.2 U8.6 U8.8 | length 1758
  Top Layer w5: v1(958,1792) v1@959,1792
  Top Layer w8: v1(-96,1693) -69,1693 C31.1 ; C31.1@-68,1693 -54,1693 -45.4,1701.6 U8.6 ; v1(-44,1797) -17.72,1797 C30.2 ; U2.27@589.96,1805.63 v1@589.96,1841.96 ; U2.45@605.73,1547.66 605.73,1564.41 v1(605.79,1564.46) ; v1(688,1844) 700.1,1831.9 700.1,1805.66 U2.20 ; U2.51 700.17,1559.86 cw(c705.71,1559.86) v1(701.79,1563.78) ; U2.54 747.41,1558.03 cw(c755.53,1558.03) 747.41,1558.15 cw(c755.53,1558.03) v1(749.79,1563.78) ; U2.3 824.25,1599.49 824.32,1599.43 826.75,1599.43 827.03,1599.15 836.22,1599.15 v1(848.71,1611.64) ccw(c840.02,1602.95) 842.03,1615.07 ccw(c840.02,1602.95) 840.02,1615.24 U2.4
  Top Layer w10: U4.10 276.18,978 276.18,942.39 v1(277.79,940.78) 277.79,921.54 279.2,920.13 279.2,911.66 C23.2 ; v1(342,1602) 342.27,1601.73 373.74,1601.73 R4.2 ; v1(460.37,1199.05) 460.58,1198.84 460.58,1170.7 C20.1 ; v1@521.79,1277.78 522.92,1276.65 522.92,1233.18 J1.10 ; v1(547,1473) 575.19,1473 C18.1 ; v1(641.79,1278.78) 641.97,1278.59 641.97,1232.23 J1.7 ; C29.1 687.89,1869.96 687.89,1844.11 v1(688,1844) ; C15.2@770.38,59.53 R3.1 R3.1@821,60.36 ; C15.2 771.37,60.51 R3.1@820.85,60.51 ; v1(812.79,1543.78) U2.1@812.79,1566.98 ; v1(848.71,1611.64) 893.82,1611.64 917.55,1635.37 C8.1 917.31,1637.58 917.31,1688.54 C9.1 916.96,1688.89 888.11,1688.89 v1(888,1689) ; C6.1 C6.1@926.65,1491.64 ; v1@957.36,1491.64 v1(958.22,1490.78)
  Top Layer w12: C5.1 v1(897.81,1478.62) ; C6.1@926.65,1491.64 v1@957.36,1491.64
  Top Layer w15: C13.1 v1(507.79,1809.78) ; v1(568,2030) U5.2@567.98,2064.9
  Top Layer w20: C15.2@770.38,59.53 v1@770.38,93 ; v1(771,93) 771,502.99 v1(811.79,543.78)
  Bottom Layer w12: v1(749.79,1563.78) 792.79,1563.78 v1(812.79,1543.78) 848.71,1579.7 v1(848.71,1611.64) ; v1(897.81,1478.62) 946.06,1478.62 v1(958.22,1490.78)
  other v1: 856.79,544.78 897.79,544.78 856.79,597.78 897.79,597.78 811.79,598.78 522.79,1278.78 590,1842
3IN: U2.13 U3.3 | length 902.1
  Top Layer w6.16: U3.3 766.15,1161.72 870.28,1161.72 v1(871,1161) ; U2.13 837.56,1756.97 863.35,1782.77 863.35,1796.35 v1(866,1799)
  Bottom Layer w6.16: v1(866,1799) 868.24,1796.76 892.81,1796.76 925.16,1764.41 925.16,1591.58 850.49,1516.91 850.49,1181.51 v1(871,1161)
4IN: U2.12 U3.4 | length 918
  Top Layer w6.16: U2.12 838.16,1741.22 872.93,1776 v1(888,1776)
  Top Layer w8: U3.4 766.87,1111 v1(872,1111)
  Bottom Layer w6.16: v1(872,1111) 839.33,1143.67 839.33,1521.53 914,1596.21 914,1750 v1(888,1776)
CC1: R5.1 USB1.A5 | length 61.3
  Top Layer w8: R5.1@355,231.5 358.5,231.5 375.17,214.83 375.17,183.27 USB1.A5
CC2: R6.1 USB1.B5 | length 56
  Top Layer w8: R6.1@485,232.5 R6.1@488.5,232.5 ; R6.1@489.5,231.5 495.19,225.81 USB1.B5
D_N: ESD2.2 J1.2 USB1.A7 USB1.B7 | length 1346.4
  Top Layer w12: USB1.B7 396.76,144.03 403.79,137 429.1,137 437.34,145.24 437.34,160.66 436.13,161.86 436.13,200.86 434.79,202.2 434.79,220.84 438.79,224.84 v1(438.79,227) 438.79,229.16 434.79,233.16 434.79,250.91 443.09,259.22 ESD2.2 ; J1.2 563.42,1001.54 552.23,990.35 552.23,941 641,852.23 684.62,808.62 688.11,808.62 692.28,804.45 v1(694.45,804.45)
  Bottom Layer w12: v1(438.79,227) 438.79,229.16 434.79,233.16 434.79,346.79 457,369 691.04,369 734,411.96 734,759.24 698.45,794.79 698.45,798.28 694.45,802.28 v1(694.45,804.45)
D_P: ESD1.2 J1.1 USB1.A6 USB1.B6 | length 1381
  Top Layer w12: ESD1.2 408.91,259.22 417.79,250.34 417.79,233.16 413.79,229.16 v1(413.79,227) 413.79,224.84 417.79,220.84 417.79,202.2 416.45,200.86 USB1.A6 ; USB1.B6 455.82,161.86 454.34,160.38 454.34,143.3 458.47,139.16 v1(458.47,137) ; J1.1 524.05,1001.54 535.23,990.35 535.23,933.96 628.98,840.21 633.96,835.23 672.6,796.6 672.6,793.1 676.77,788.93 v1(676.77,786.77)
  Bottom Layer w12: v1(458.47,137) 458.47,167.53 415.32,210.68 415.32,225.47 v1(413.79,227) 413.79,229.16 417.79,233.16 417.79,353.83 449.96,386 684,386 717,419 717,752.19 683.96,785.24 678.3,785.24 v1(676.77,786.77)
DTR: J1.4 Q2.2 R8.1 | length 683.9
  Top Layer w6.16: Q2.2 361.19,1352.81 394.78,1319.22 R8.1 438.91,1318.34 438.91,1290.03 491,1237.93 v1(491,971.78) ; J1.4 J1.4@642.79,1014.88
  Top Layer w8: v1(642.79,971.78) J1.4@642.79,1014.88
  Bottom Layer w6.16: v1(491,971.78) v1(642.79,971.78)
EN: C12.1 KEY1.2 KEY1.3 Q1.3 R4.1 U2.56 | length 919.8
  Top Layer w6.16: KEY1.2 385.12,1625.78 407.48,1603.42 R4.1 ; R4.1@408.46,1602.44 408.46,1550.99 C12.1 409.44,1483.7 423.07,1470.07 Q1.3 ; Q1.3 v1(508.53,1470) ; U2.56 778.79,1535 778.79,1513.36 782.4,1509.75 v1(812.79,1509.75)
  Top Layer w8: KEY1.3 KEY1.2
  Bottom Layer w6.16: v1(508.53,1470) 508.53,1491.53 526.75,1509.75 v1@812.25,1509.75
GND: ANT1.2 C2.2 C3.2 C4.2 C5.2 C6.2 C7.2 C8.2 C9.2 C10.2 C11.2 C12.2 C13.2 C14.1 C16.2 C17.2 C18.2 C19.2 C20.2 C21.2 C22.1 C23.1 C24.2 C28.2 C29.2 C30.1 C31.2 ESD1.1 ESD2.1 ESD3.1 J1.3 J1.11 KEY1.1 KEY1.4 LED1.2 R5.2 R6.2 R12.2 R25.2 U1.2 U2.57 U3.8 U4.2 U4.13 U4.14 U4.21 U4.22 U4.23 U4.24 U4.25 U4.26 U4.27 U4.28 U4.29 U4.30 U5.4 U8.1 U8.7 U.4 USB1.1 USB1.2 USB1.3 USB1.4 USB1.A1 USB1.A12 USB1.B1 USB1.B12 X1.2 X1.4 | length 2057.1
  Top Layer w8: v1(-98,1730) -97,1729 -68.43,1729 C31.2 ; C31.2@-66.3,1728.3 -27.2,1728.3 U8.7
  Top Layer w15: v1(-64.06,1611.94) R25.2@-64.06,1633.49 ; C7.2 -22.09,361.94 -22.09,332.16 v1(-21.96,332.03) ; KEY1.4 KEY1.1 262,1544.57 v1(262,1517) ; v1(143.79,392.78) 144.79,391.78 C2.2 ; U4.2 160.56,1074.81 216.37,1074.81 236.49,1054.69 U4.21 U4.21@236.9,1054.69 ; LED1.2 165.05,-57.48 v1(165.79,-58.22) ; v1@216.14,207.78 284.22,207.78 USB1.A1@298,194 ; C22.1 258.59,1241.78 v1(259.75,1242.94) ; U4.13 313.05,1054.69 312.62,1055.13 272.13,1055.13 271.69,1054.69 U4.21@236.9,1054.69 ; U4.14 312.83,1074.81 257.02,1074.81 U4.21@236.9,1054.69 ; C23.1 317.51,938.64 v1(318.01,939.15) ; v1(340.36,1519.21) 340.36,1541.22 349.14,1550.01 C12.2 ; R5.2 v1(361,297) ; C24.2 374.31,973.07 396,951.38 v1(396,951) ; ESD1.1@396,293.78 v1(396,314) ; v1(414.11,1809.89) 414.16,1809.84 448.02,1809.84 C13.2 ; v1(440.79,2071.78) 485.21,2071.78 488.54,2068.45 U5.4 ; v1(447,1730) v1(447,1730) 447.04,1755.74 C19.2 ; ESD2.1 454.91,286.78 455.28,287.15 455.28,293.06 456,293.78 v1(456,314) ; v1(460.73,1112.88) 460.73,1135.01 C20.2 ; R6.2 v1(491,297) ; v1@546.74,1436.65 547,1436.65 C18.2@575.77,1436.65 ; USB1.A12@554.96,181.36 ESD3.1 ; ESD3.1 v1(554.99,267.23) ; J1.11 J1.3 603.29,1015.01 603.29,941.28 v1(603.79,940.78) ; v1(671.79,1401.78) 672.25,1402.24 711.19,1402.24 X1.4 ; v1(682,1447) v1(682,1447) 682.04,1472.44 682.08,1472.48 C10.2 ; C29.2 688,1905.7 v1@688,1933.5 ; U3.8 765.65,912.22 823.78,912.22 v1(824,912) ; X1.2 783.26,1354.73 783.26,1321.74 v1(784,1321) ; v1@801.65,1444.92 C11.2@801.65,1472.43 ; v1@818.03,855.97 C21.2 ; v1(853.79,-7.22) 853.97,-7.04 883.35,-7.04 R12.2 ; C5.2 862.18,1443.51 897.53,1443.51 v1(897.81,1443.78) ; C4.2 890.34,1548.07 909.45,1528.96 924.04,1528.96 v1(925,1528) ; C6.2 925.91,1457.07 926.29,1456.69 926.29,1426.28 v1(926.79,1425.78) ; C28.2 935.27,-7.94 962.5,-7.94 v1(962.79,-8.22) ; C9.2 952.5,1688.9 952.88,1689.28 984.29,1689.28 v1(984.79,1689.78) ; C8.2@953.36,1637.78 v1(984.79,1637.78) ; v1@988.41,1845.16 v1(988.79,1844.78) ; C17.2@992.32,755.78 C17.2 ; v1(1006.79,-8.22) 1008.14,-8.22 1009.13,-7.23 1034.92,-7.23 C16.2 ; C3.2@1021.18,1547.69 C3.2@1021.24,1547.69 ; v1(1021.69,1512.97) 1021.24,1513.42 C3.2@1021.24,1547.69 ; C14.1 1033.92,577.5 1034.29,577.87 1034.29,606.28 v1(1034.79,606.78) ; ANT1.2 1073.48,1547.68 1028.28,1547.68 C3.2@1021.24,1547.69
  other v1: 214.79,207.78 1041,754 818,856 546.73,1436.67 801.79,1444.78 604,1603 676,1603 747,1603 604,1659 676,1659 747,1659 604,1736 676,1736 747,1736 48,1797 688,1935.5
INT: R25.1 U2.28 U8.5 | length 757.1
  Top Layer w8: R25.1 R25.1@-26.79,1637 ; U8.5 -26.79,1675.29 R25.1@-26.79,1637 ; v1(261.07,1691.93) 105.93,1691.93 51,1637 R25.1@-26.79,1637 ; v1@556.5,1845.5 574.18,1827.82 U2.28
  Bottom Layer w8: v1(261.07,1691.93) 415.14,1846 v1(557,1846)
IO0: Q2.3 U2.5 | length 707.4
  Top Layer w6.16: Q2.3@322,1471 322.93,1470.07 Q2.3 v1(359.32,1470.07) ; U2.5 811.88,1630.88 857.88,1630.88 866,1639 v1(883.71,1639)
  Bottom Layer w6.16: v1(359.32,1470.07) 424.07,1470.07 585,1631 859,1631 867,1639 v1(883.71,1639)
IO1: U2.41 U4.7 | length 997
  Top Layer w6.16: v1(206.17,935.78) 217.01,946.62 U4.7 ; v1(443,1591.78) 489.2,1591.78 497.58,1583.4 540.97,1583.4 U2.41
  Bottom Layer w6.16: v1(206.17,935.78) 173,968.95 173,1092 223.88,1142.88 257.53,1142.88 299.53,1184.88 299.53,1528.53 362.78,1591.78 v1(443,1591.78)
IO2: U2.42 U4.8 | length 925.8
  Top Layer w6.16: v1@235.79,935.78 236.7,936.69 U4.8 ; v1(443,1549) 461.99,1567.99 U2.42
  Bottom Layer w6.16: v1(236.79,935.78) 292.22,991.21 292.22,1161.78 310.69,1180.26 310.69,1523.69 354.78,1567.78 424.22,1567.78 v1(443,1549)
LED: U2.37 U5.1 | length 954
  Top Layer w6.16: v1(201,1720) 201.24,1719.76 381.24,1719.76 454.27,1646.73 U2.37 ; U5.1 U5.1@612.81,2065
  Top Layer w10: v1(612.81,2017.78) U5.1@612.81,2065
  Bottom Layer w6.16: v1(201,1720) 202.87,1720 443.87,1961 530,1961 586.78,2017.78 v1(612.81,2017.78)
NCS: U2.38 U4.3 | length 947.2
  Top Layer w6.16: U4.3 158.08,1056.73 139.97,1056.73 124.68,1072.03 124.68,1141.68 140.02,1157.02 v1(164.84,1157.02) ; v1(472,1618) 484.99,1630.99 U2.38
  Bottom Layer w6.16: v1(164.84,1157.02) 197.02,1157.02 235.51,1195.51 235.51,1545.51 320.78,1630.78 459.22,1630.78 v1(472,1618)
NetANT1_1: ANT1.1 C3.1 L1.1 | length 102.5
  Top Layer w15: L1.1 1018.3,1584.98 1018.82,1585.5 C3.1 1020.97,1585.68 ANT1.1
NetC1_1: C1.1 U4.17 | length 120
  Top Layer w10: v1(-12.21,1314.78) -10.3,1312.87 v1@-10.3,1307.24 ; C1.1@37.01,1259.93 59.14,1259.93 C1.1@75.79,1276.58 ; U4.17 256.38,1179.38 v1(269,1192)
  other v1: 75.79,1312.78
NetC4_1: C4.1 L1.2 U2.2 | length 126.8
  Top Layer w8: U2.2 813.93,1583.74 814.22,1583.45 888.33,1583.45 C4.1
  Top Layer w12: C4.1 889.12,1584.24 935.97,1584.24 936.72,1584.98 L1.2
NetC10_1: C10.1 U2.52 X1.1 | length 242.4
  Top Layer w8: v1(672,1356) 711.12,1356 X1.1 X1.1@715.6,1355.46 ; U2.52 715.91,1476.37 C10.1 v1(717.51,1447)
  Bottom Layer w8: v1(672,1356) 717.51,1401.51 v1(717.51,1447)
NetC11_1: C11.1 U2.53 X1.3 | length 161.6
  Top Layer w8: U2.53 731.66,1512.19 762.2,1481.65 762.2,1480.62 768.04,1474.78 C11.1@769.07,1474.78
  Top Layer w10: C11.1 766.07,1422.39 767.83,1420.63 767.83,1413.46 776.29,1405 X1.3@783.46,1405 ; X1.3@778.58,1402.71 X1.3
NetC15_1: C15.1 R3.2 R12.1 U.5 | length 187.4
  Top Layer w20: C15.1 R3.2 882.99,26.07 R12.1 883.54,98.79 U.5
NetC16_1: C16.1 U.8 | length 71.7
  Top Layer w20: U.8 1035.29,99.65 C16.1
NetC19_1: C19.1 U2.30 | length 59.3
  Top Layer w6.16: C19.1 C19.1@483.36,1756.63 ; U2.30@540.97,1756.63 U2.30
  Top Layer w8: C19.1@483.36,1756.63 U2.30@540.97,1756.63
NetC24_1: C24.1 U4.11 | length 61.9
  Top Layer w6.16: U4.11 325.67,1015.32 332.5,1008.5 C24.1
NetC25_1: C25.1 U4.12 | length 114.8
  Top Layer w6.16: U4.12 313.71,1035.44 366.38,1035.44 376.32,1025.5 C25.1@423.79,1025.5
NetC25_2: C25.2 R24.1 | length 175
  Top Layer w15: R24.1 437.22,1092.78 457,1073 457,1004 442.28,989.28 C25.2
NetC26_2: C26.2 U4.18 | length 59.6
  Top Layer w5: C26.2 C26.2@236.49,1189.35 ; U4.18@236.49,1131.47 U4.18
  Top Layer w6: U4.18@236.49,1131.47 C26.2@236.49,1189.35
NetC27_1: C27.1 U.1 | length 90.8
  Top Layer w20: U.1 1034.78,312.76 1034.78,402.76 C27.1
NetC27_2: C27.2 L2.2 U.3 | length 230.3
  Top Layer w20: v1(934.27,367.87) 934.27,313.27 U.3 ; C27.2 1035.29,469.28 v1(1035.79,469.78)
  Bottom Layer w20: v1@934.27,368.26 v1(1035.79,469.78)
NetC28_1: C28.1 U.6 | length 72.4
  Top Layer w20: U.6 934.78,100.04 934.78,27.98 C28.1
NetESD3_2: ESD3.2 F6.2 USB1.A4 USB1.A9 USB1.B4 USB1.B9 | length 11.8
  Top Layer w6.16: USB1.A4 USB1.B9
NetJP1_2: JP1.2 U3.13 | length 247.9
  Top Layer w20: U3.13 976.74,1112.76 1006.45,1112.76 1006.9,1113.21 1033.36,1113.21 1054.79,1091.78 1054.79,1039.17 JP1.2
NetJP1_3: JP1.3 U3.14 | length 195.7
  Top Layer w20: U3.14 1031.43,1162.45 1130.88,1063 JP1.3
NetJP1_4: JP1.4 U3.15 | length 175
  Top Layer w20: U3.15 1081.52,1212.45 JP1.4
NetJP1_5: JP1.5 U3.16 | length 154.8
  Top Layer w20: U3.16 976.74,1262.76 1035.16,1262.76 1035.4,1263 JP1.5
NetLED1_1: LED1.1 R1.2 | length 162.3
  Top Layer w8: R1.2 144.79,156.21 165.05,135.95 LED1.1
NetQ1_1: Q1.1 R8.2 | length 73.4
  Top Layer w6.16: Q1.1 442.85,1349.83 471.5,1321.19 R8.2
NetQ2_1: Q2.1 R11.2 | length 308.6
  Top Layer w6.16: Q2.1 286.39,1348.61 316.22,1318.78 v1(368.01,1318.78) ; v1(504.79,1318.78) 549.07,1318.78 R11.2
  Bottom Layer w6.16: v1(368.01,1318.78) v1(504.79,1318.78)
NetR2_1: R2.1 U.7 | length 241.3
  Top Layer w20: U.7 984.84,51.73 v1(985.88,50.69) ; R2.1 1098.79,194.09 v1(1098.79,166.78)
  Bottom Layer w20: v1(985.88,50.69) 1098.79,163.59 v1(1098.79,166.78)
OUT: U1.5 U2.19 | length 2111.9
  Top Layer w6.16: U2.19 715.91,1912
  Top Layer w8: 715.91,1912 v1@715.91,2048.91
  Bottom Layer w8: U1.5 -32.21,838.21 -89.21,895.21 -89.21,1537.79 422,2049 v1(716,2049)
OUT3: U2.9 U4.1 | length 1273.7
  Top Layer w6.16: v1(145.08,1124.88) 144.76,1124.55 144.76,1099.71 145.68,1098.79 145.68,1096.1 147.72,1094.06 U4.1 ; U2.9 834.98,1693.98 846.84,1705.84 859.85,1705.84 v1(860.79,1706.78)
  Bottom Layer w6.16: v1(145.08,1124.88) 145.08,1497.08 354.7,1706.7 860.71,1706.7 v1(860.79,1706.78)
OUT4: U2.8 U4.19 | length 1163.3
  Top Layer w5: U4.19 217.43,1131.68 v1(217.43,1271.78) ; U2.8 811.9,1678.12 859.88,1678.12 v1@860,1678
  Bottom Layer w6.16: v1(217.43,1271.78) 217.43,1549.43 346,1678 v1(860.79,1678)
OUTA: JP2.1 R24.2 U4.15 | length 569.9
  Top Layer w10: U4.15 313.39,1093.94 325.79,1093.94 326.11,1093.63 v1(349.31,1093.63) 349.73,1093.2 370.66,1093.2 R24.2
  Bottom Layer w6.16: JP2.1@263.2,617.78 263.2,817.19 349.31,903.3 v1(349.31,1093.63)
OUTB: JP2.2 U4.16 | length 784
  Top Layer w6.16: U4.16 276.07,1158.07 285,1167 v1(323,1167)
  Bottom Layer w6.16: v1(323,1167) 400,1167 428,1139 428,907 593.9,741.1 JP2.2@593.9,617.78
RTS: J1.6 Q1.2 R11.1 | length 272.6
  Top Layer w6.16: Q1.2 517.65,1352.35 525,1345 558.28,1345 583.53,1319.75 R11.1 645.79,1317.78 681.53,1282.04 J1.6
RXD: J1.9 U2.48 | length 349.5
  Top Layer w6.16: J1.9 564.79,1233.42 v1(564.79,1278.78) ; v1(618,1489) 634,1489 652.92,1507.92 U2.48
  Bottom Layer w6.16: v1(564.79,1278.78) 564.79,1435.79 v1(618,1489)
RXD_1: U1.4 U2.23 | length 1995.1
  Top Layer w8: v1(432,2009) 571.38,2009 652.86,1927.53 U2.23 U2.23
  Bottom Layer w8: U1.4 16.79,708.78 16.79,813.86 -76.21,906.86 -76.21,1500.79 v1(432,2009)
SCL: R27.2 U2.11 U8.4 | length 1013.6
  Top Layer w5: U2.11 837.37,1725.47 860.9,1749 R27.2@925.52,1749
  Top Layer w8: U8.4 56,1676 124,1744 357,1744 v1(358,1743)
  Bottom Layer w8: v1(358,1743) 378,1763 867.06,1763 v1(879.2,1750.86)
SCLK: U2.17 U4.4 | length 1466.6
  Top Layer w6.16: v1(122.44,1035.7) 159.43,1035.7 U4.4 ; U2.17 747.41,1852.41 v1(771,1876)
  Bottom Layer w6.16: v1(122.44,1035.7) 122.44,1090.79 114,1099.23 114,1586.22 424.78,1897 750,1897 v1(771,1876)
SDA: R26.2 U2.10 U8.3 | length 1403.2
  Top Layer w5: U2.10 835.76,1709.73 856.04,1730 v1(995,1730)
  Top Layer w8: U8.3 49.6,1701.6 310,1962 v1(568,1962)
  Bottom Layer w8: v1(568,1962) 568.16,1962.16 837,1962.16 995,1804.16 v1(995,1730)
SDI: U2.18 U4.5 | length 1454.3
  Top Layer w6.16: v1(120,1002) 133.32,1015.32 U4.5 ; U2.18 731.66,1842.66 736,1847 v1(735.99,1874.86) ; v1@735.99,1871.11 v1(735.99,1874.86)
  Bottom Layer w6.16: v1(120,1002) 149.03,1031.03 149.03,1079.99 125.16,1103.86 125.16,1581.59 418.43,1874.86 v1(735.99,1874.86)
SDO: U2.16 U4.6 | length 1631.6
  Top Layer w6.16: v1(154.39,978.12) U4.6 ; U2.16 763.16,1847.16 773.33,1857.33 v1(790.96,1857.33)
  Bottom Layer w6.16: v1(154.39,978.12) 118.31,978.12 101.92,994.51 101.92,1589.92 423,1911 762,1911 793,1880 793,1859.37 v1(790.96,1857.33)
TXD: J1.8 U2.49 | length 344.3
  Top Layer w6.16: J1.8@602.79,1218.07 J1.8 v1(602.79,1278.78) v1@602.79,1279.78 ; v1(642,1471) 668.67,1497.67 U2.49
  Bottom Layer w6.16: v1@602.79,1279.78 602.79,1431.79 v1(642,1471)
TXD_1: U1.3 U2.24 | length 1999.9
  Top Layer w8: v1(461,1990) 463,1988 574,1988 637.17,1924.83 U2.24
  Bottom Layer w8: U1.3 29.79,671.78 29.79,819.25 -63.21,912.25 -63.21,1492.92 433.87,1990 v1(461,1990)
VIN5V: C1.2 C2.1 C7.1 C14.2 C21.1 C22.2 C26.1 F6.1 JP1.1 R1.1 R2.2 U1.1 U3.9 U4.20 U.2 | length 185.8
  Top Layer w10: C7.1@-27.05,400.37 -24.18,397.5 C7.1 ; C1.2 C1.2@53.79,1150.63 ; v1(166.79,1192.78) 168.01,1191.56 198.86,1191.56 C26.1 ; v1(166.79,1240.78) 167.29,1241.28 199.57,1241.28 C22.2 ; v1(173.06,1124.01) 197.21,1124.01 197.33,1124.12 U4.20
  Top Layer w15: C7.1@-21.9,398.26 v1@-21.9,428.05
  Top Layer w30: v1(1097.79,274.78) 1097.85,274.72 R2.2
  other v1: 105.79,266.78 178.79,275.78 105.79,294.78 144.79,295.78 104.79,324.78 178.79,331.78 -21.96,428.11 998.79,476.78 971.79,501.78 996.79,535.78 972.79,563.78 996.33,599.34 970.79,638.78 80.79,1098.78 -7.21,1099.78
VOUT: U2.7 U4.9 | length 145.9
  Top Layer w6.16: U4.9 256.69,977.81 256.69,876.31 v1(257,876) ; U2.7 840.52,1662.48 v1(851,1652)
pads on no net: J1.5 U2.6 U2.21 U2.22 U2.25 U2.26 U2.29 U2.31 U2.32 U2.33 U2.34 U2.35 U2.36 U2.39 U2.40 U2.43 U2.44 U2.46 U2.47 U2.50 U2.55 U3.5 U3.6 U3.7 U3.10 U3.11 U3.12 U5.3 U8.2 U.9 U.10 U.11 U.12 U.13 U.14 U.15 U.16 U.17 USB1.A8 USB1.B8

## Polygon pours and split planes (outlines as drawn)
GND on Top Layer "GND_L01_P009" (solid, pour order 9): 1273.94,2079.28 1273.94,-78.62 cw(c1234.44,-78.62) 1234.44,-118.12 -94.93,-118.12 cw(c-94.93,-78.84) -134.21,-78.84 -134.21,2020.48 cw(c-34.21,2020.48) -34.21,2120.48 1232.74,2120.48 cw(c1232.74,2079.28)
NetESD3_2 on Top Layer "NETESD3_2_L01_P001" (solid, pour order 1): 293.51,228.49 266.07,228.49 263.79,230.78 263.79,332.78 268.79,337.78 321.79,337.78 334,325.57 334,228 348,214 348,156 374,130 484,130 508.79,154.79 508.79,261.78 529.79,261.78 535.79,255.78 535.79,108.78 496.01,69 342.57,69 315.25,96.32 315.25,206.75
VIN5V on Top Layer "VIN5V_L01_P000" (solid, pour order 0): 108.95,1204.87 -19.6,1204.87 -38.32,1186.15 -38.32,1087.15 -25.32,1074.15 111.68,1074.15 124.68,1087.15 124.68,1189.15
NetC1_1 on Top Layer "NETC1_1_L01_P007" (solid, pour order 7): 108.07,1339.5 -20.49,1339.5 -39.21,1320.78 -39.21,1221.78 -26.21,1208.78 110.79,1208.78 123.79,1221.78 123.79,1323.78
GND on Top Layer "GND_L01_P006" (solid, pour order 6): 895.11,355.46 912.79,337.78 912.79,278.78 919.79,271.78 919.79,239.78 860.79,239.78 845.79,254.78 845.79,342.78 858.47,355.46
VIN5V on Top Layer "VIN5V_L01_P005" (solid, pour order 5): 260.79,336.78 239.79,357.78 162.79,357.78 148.79,343.78 92.79,343.78 83.79,334.78 83.79,259.78 106.79,236.78 256.28,236.78 260.79,241.29
3.3V on Top Layer "3.3V_L01_P004" (solid, pour order 4): 931.79,705.78 962.79,736.78 962.79,778.78 951.79,789.78 847.79,789.78 781.79,723.78 781.79,521.78 798.79,504.78 918.79,504.78 931.79,517.78
VIN5V on Top Layer "VIN5V_L01_P003" (solid, pour order 3): 1020.79,471.78 1066.79,517.78 1066.79,550.78 1057.79,559.78 1026.08,559.78 1012.79,573.07 1012.79,659.78 999.79,672.78 963.79,672.78 954.79,663.78 954.79,282.78 969.79,267.78 1014.79,267.78 1020.79,273.78
NetC27_2 on Top Layer "NETC27_2_L01_P002" (solid, pour order 2): 950.79,275.78 950.79,438.78 898.79,490.78 787.79,490.78 775.79,478.78 775.79,392.78 804.79,363.78 886.79,363.78 912.79,337.78 912.79,278.78 917.79,273.78 948.79,273.78
GND on Bottom Layer "GND_L04_P008" (solid, pour order 8): 1273.94,2079.28 1273.94,-78.62 cw(c1234.44,-78.62) 1234.44,-118.12 -94.93,-118.12 cw(c-94.93,-78.84) -134.21,-78.84 -134.21,2020.48 cw(c-34.21,2020.48) -34.21,2120.48 1232.74,2120.48 cw(c1232.74,2079.28)
VIN5V on POWER (split plane): 221.42,1104.72 169.13,1052.44 167.26,1050.15 165.86,1047.55 165.01,1044.72 164.72,1041.78 164.72,374.79 165.01,371.85 165.86,369.02 167.26,366.42 169.13,364.13 170.92,362.34 173.21,360.47 175.81,359.07 178.64,358.22 181.58,357.93 933.79,357.93 936.73,358.22 939.56,359.07 942.16,360.47 944.45,362.34 946.32,364.63 947.72,367.23 948.57,370.06 948.86,373 948.86,901.71 1256.94,901.71 1256.94,-70.59 1256.75,-71.42 1256.72,-71.66 1256.65,-71.9 1256.48,-73.62 1256.27,-75.33 1256.29,-75.57 1256.26,-75.82 1256.26,-78.02 1255.49,-82.35 1253.97,-86.47 1251.75,-90.26 1248.9,-93.61 1245.5,-96.4 1241.66,-98.55 1237.51,-99.99 1235.34,-100.34 1234.69,-100.51 1234.03,-100.59 1232.79,-101 1232.35,-101.12 -86.46,-101.12 -87.25,-100.9 -88.02,-100.85 -88.78,-100.71 -89.98,-100.72 -91.18,-100.63 -93.36,-100.7 -97.69,-100.06 -101.83,-98.68 -105.67,-96.6 -109.09,-93.88 -111.98,-90.6 -114.25,-86.87 -115.84,-82.8 -116.26,-80.65 -116.52,-79.79 -116.69,-78.9 -117.09,-77.9 -117.21,-77.53 -117.21,1255.71 221.42,1255.71
3.3V on POWER (split plane): 1038.79,1454.78 1049.79,1443.78 1256.94,1443.78 1256.94,931.85 933.79,931.85 930.85,931.56 928.02,930.7 925.42,929.31 923.13,927.44 921.26,925.15 919.86,922.55 919.01,919.72 918.72,916.78 918.72,388.07 194.86,388.07 194.86,821.93 714,821.93 716.94,822.22 719.77,823.07 722.37,824.47 724.66,826.34 794.66,896.34 824.66,926.34 826.53,928.63 827.93,931.23 828.78,934.06 829.07,937 829.07,1197.76 898.66,1267.34 900.53,1269.63 901.93,1272.23 902.78,1275.06 903.07,1278 903.07,1491 903.07,1683 902.78,1685.94 901.93,1688.77 900.53,1691.37 898.66,1693.66 896.37,1695.53 893.77,1696.93 890.94,1697.78 888,1698.07 807,1698.07 804.06,1697.78 801.23,1696.93 798.63,1695.53 796.34,1693.66 794.47,1691.37 793.07,1688.77 792.22,1685.94 791.93,1683 791.93,1491 791.93,1309.24 788.34,1305.66 730.34,1247.66 728.47,1245.37 727.07,1242.77 726.22,1239.94 725.93,1237 725.93,974.24 681.76,930.07 194.86,930.07 194.86,1035.54 234.59,1075.26 236.7,1075.05 315.77,1075.05 318.71,1075.34 321.54,1076.2 324.14,1077.59 326.43,1079.47 330.25,1083.29 359.45,1112.49 361.32,1114.77 362.72,1117.38 363.57,1120.2 363.86,1123.14 363.86,1334.78 363.57,1337.72 362.72,1340.55 361.32,1343.15 359.45,1345.44 253.45,1451.44 251.16,1453.31 248.56,1454.7 245.73,1455.56 242.79,1455.85 -117.21,1455.85 -117.21,2072.1 -117.1,2072.57 -117.06,2073.7 -116.94,2074.83 -117,2075.67 -116.98,2076.51 -117.14,2078.88 -116.55,2083.59 -115.09,2088.11 -112.79,2092.27 -109.74,2095.91 -106.06,2098.92 -101.88,2101.17 -97.35,2102.58 -94.99,2102.85 -94.51,2102.95 -94.02,2102.98 -92.59,2103.36 -92.04,2103.48 1038.79,2103.48
VOUT on POWER (split plane): 872.93,1491 872.93,1284.24 803.34,1214.66 801.47,1212.37 800.07,1209.77 799.22,1206.94 798.93,1204 798.93,943.24 773.34,917.66 707.76,852.07 194.86,852.07 194.86,899.93 688,899.93 690.94,900.22 693.77,901.07 696.37,902.47 698.66,904.34 751.66,957.34 753.53,959.63 754.93,962.23 755.78,965.06 756.07,968 756.07,1230.76 809.66,1284.34 817.66,1292.34 819.53,1294.63 820.93,1297.23 821.78,1300.06 822.07,1303 822.07,1491 822.07,1667.93 872.93,1667.93
NetC1_1 on POWER (split plane): 333.72,1328.54 333.72,1129.39 309.53,1105.2 251.56,1105.2 251.56,1270.78 251.27,1273.72 250.42,1276.55 249.02,1279.15 247.15,1281.44 244.86,1283.31 242.26,1284.7 239.43,1285.56 236.49,1285.85 -117.21,1285.85 -117.21,1425.71 236.55,1425.71
GND on GND (split plane): 1038.79,1454.78 1049.79,1443.78 1248.86,1443.78 1248.86,-72.82 1249.17,-76.74 1250.09,-80.57 1251.6,-84.21 1253.49,-87.29 1251.75,-90.26 1248.9,-93.61 1245.5,-96.4 1241.66,-98.55 1237.51,-99.99 1235.34,-100.34 1234.69,-100.51 1234.03,-100.59 1232.79,-101 1232.35,-101.12 -86.46,-101.12 -87.25,-100.9 -88.02,-100.85 -88.78,-100.71 -89.98,-100.72 -91.18,-100.63 -93.36,-100.7 -97.69,-100.06 -101.83,-98.68 -105.67,-96.6 -109.09,-93.88 -111.98,-90.6 -114.25,-86.87 -115.84,-82.8 -116.26,-80.65 -116.52,-79.79 -116.69,-78.9 -117.09,-77.9 -117.21,-77.53 -117.21,2072.1 -117.1,2072.57 -117.06,2073.7 -116.94,2074.83 -117,2075.67 -116.98,2076.51 -117.14,2078.88 -116.55,2083.59 -115.09,2088.11 -112.79,2092.27 -109.74,2095.91 -106.06,2098.92 -101.88,2101.17 -97.35,2102.58 -94.99,2102.85 -94.51,2102.95 -94.02,2102.98 -92.59,2103.36 -92.04,2103.48 1038.79,2103.48

## Keep-outs
Keep-Out Layer:
  circle w5: c1155.83,-0.01 r59.06
  circle w5: c0,2002.78 r59.06
  circle w5: c1155.83,2002.37 r59.06
  circle w5: c0,0 r59.06
  circle w5: c0,2002.78 r59.06
  circle w5: c0,0 r59.06
  circle w5: c1155.83,-0.01 r59.06